# Altium PCB a4403-ELE_PCB.PcbDoc (part 5 of 5)
Units mm, origin at the board's own origin, x right, y up, seen from the top; angles counter-clockwise.
Board outline 160 x 110 mm, 4 copper layers (Top Layer, Int1 (GND), Int2 (PWR), Bottom Layer), stack 1.369 mm thick; 389 components, 298 nets, 1653 pads, 661 vias.
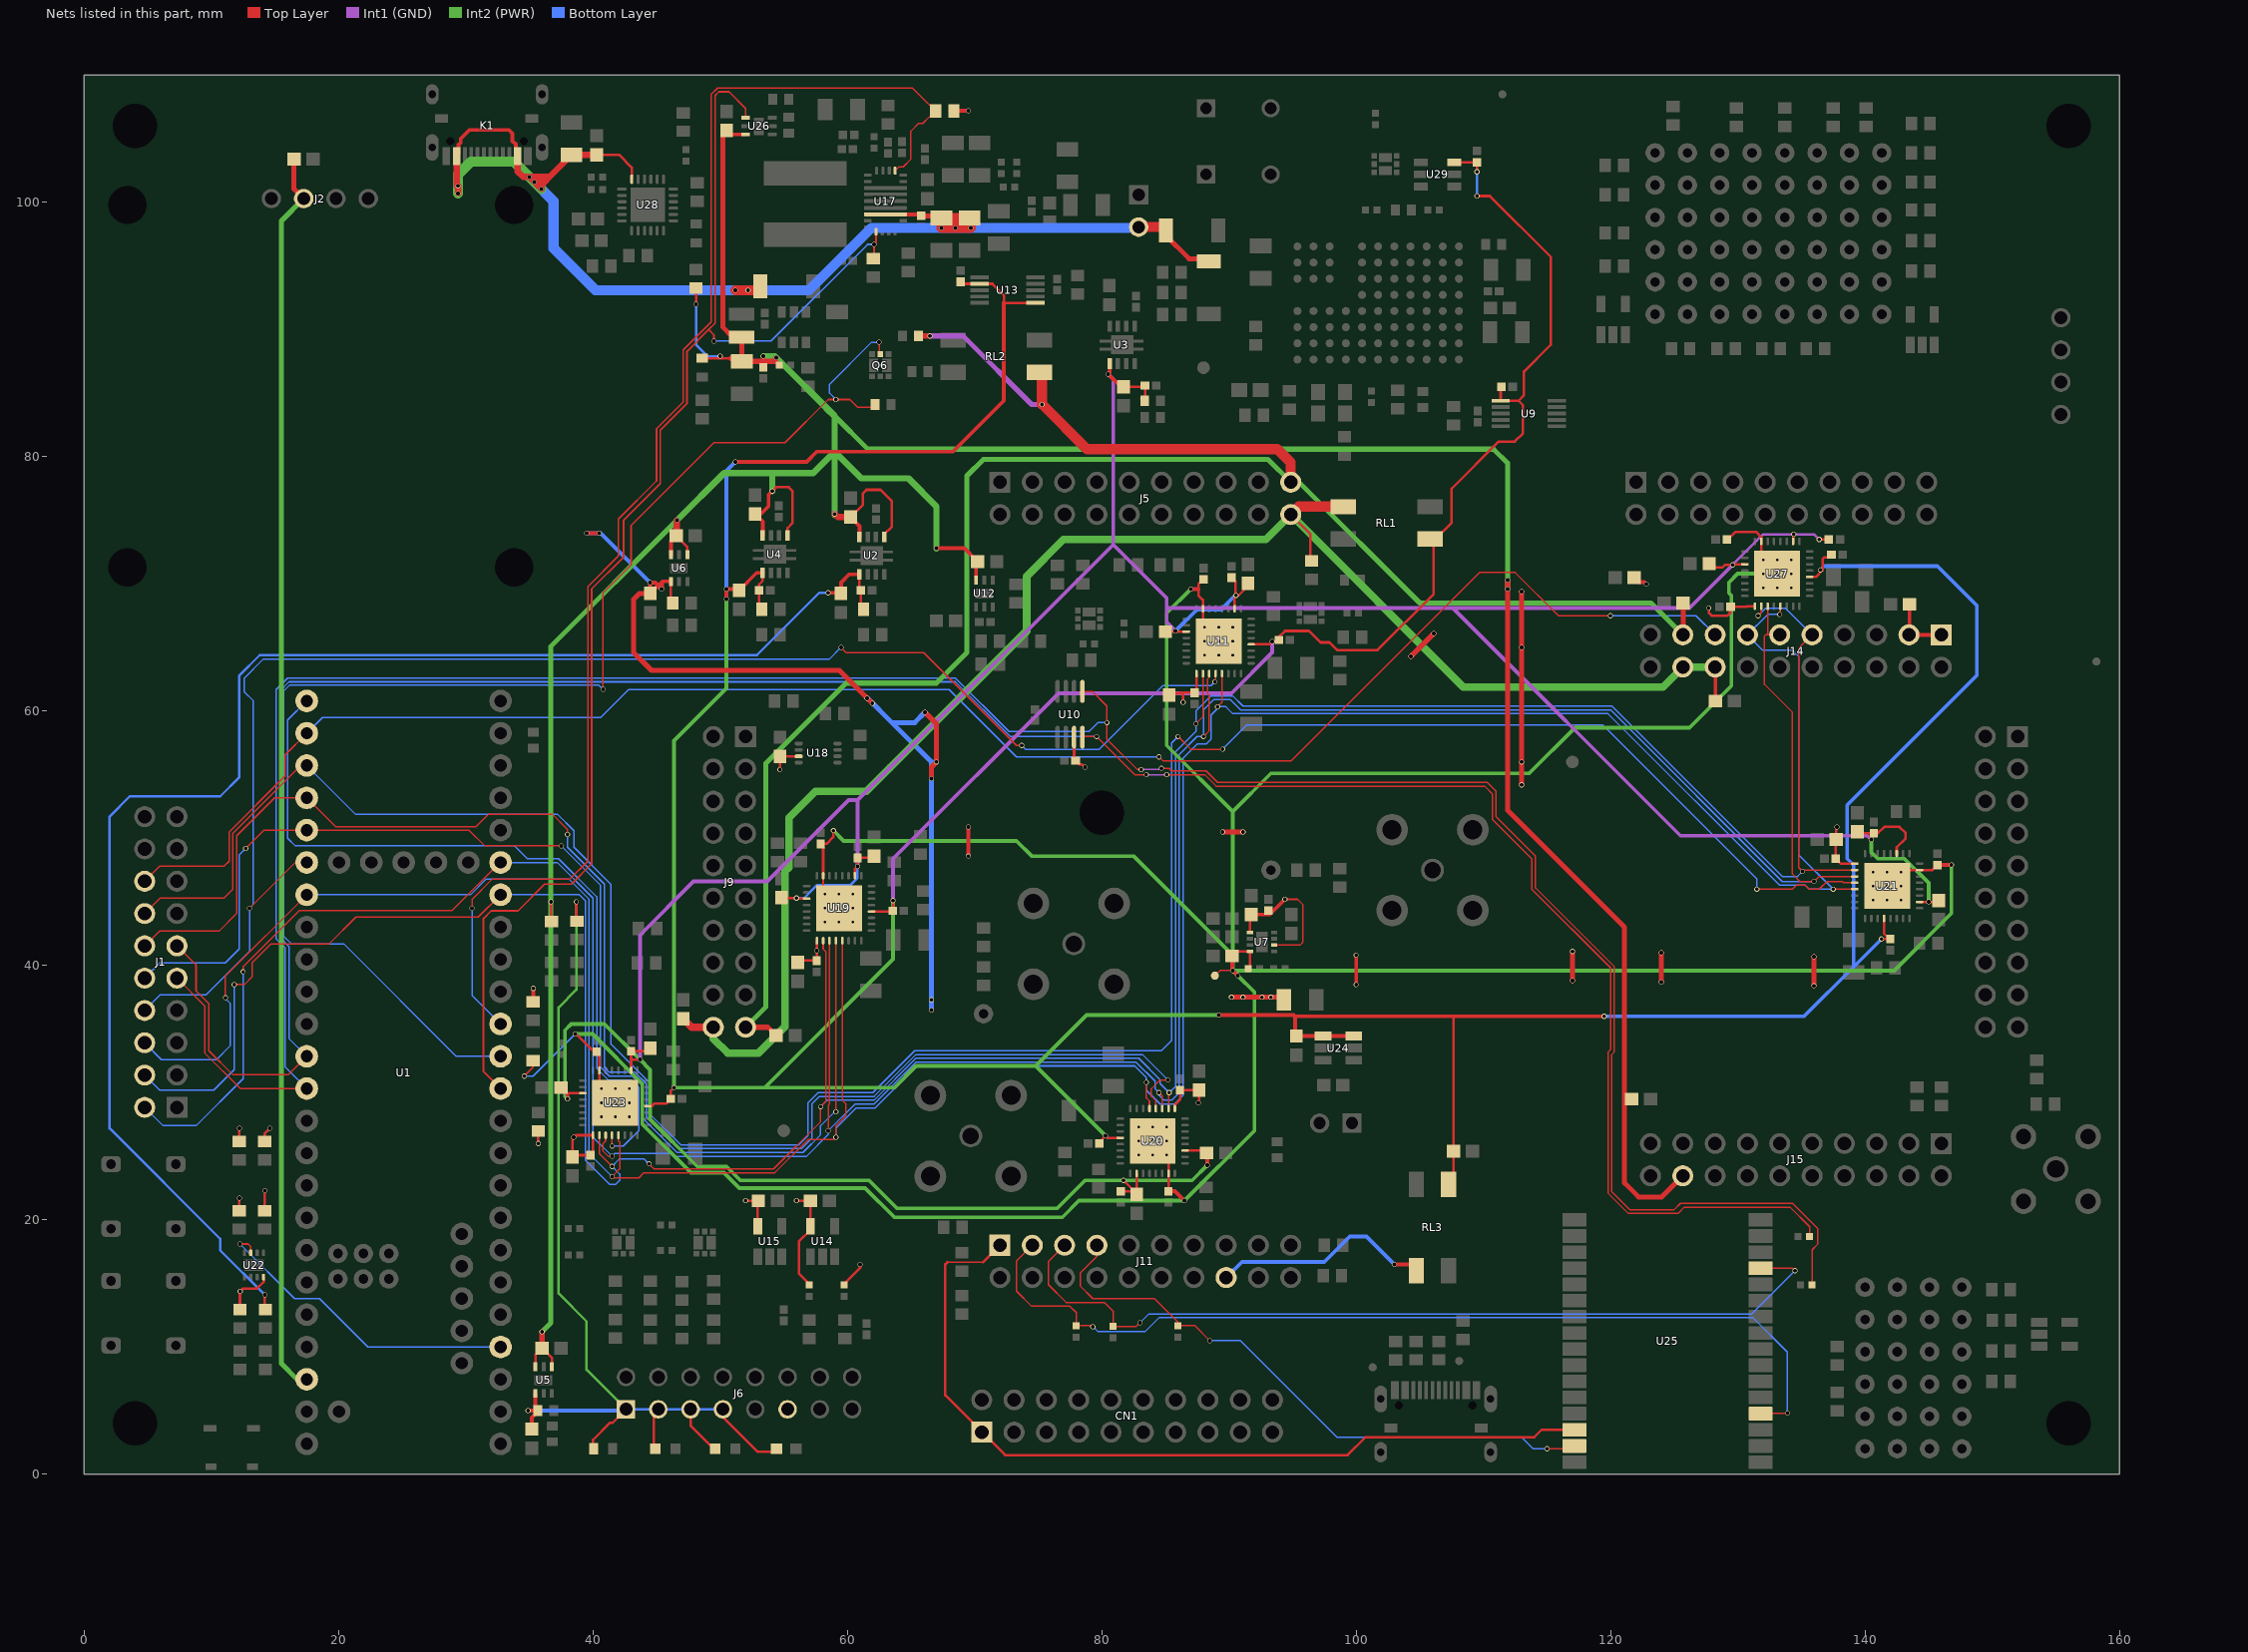
[diagram p6: the nets of this part, all layers, seen from the top]

## Via types
v1: diameter 0.4, hole 0.3, Top Layer to Bottom Layer, tented both sides, 576 vias
v2: diameter 0.5, hole 0.2, Top Layer to Bottom Layer, tented both sides, 59 vias
v3: diameter 0.4, hole 0.2, Top Layer to Bottom Layer, tented both sides, 24 vias
v4: diameter 0.5, hole 0.2, Top Layer to Bottom Layer, 2 vias

## Nets (pads, with @x,y where several pads share a name; then routed paths per layer and width w, separated by ;. In a path a pad name is that pad's centre, name@x,y a point inside that pad or via, vN(x,y) a via of type N, cw(c..) or ccw(c..) an arc to the next point about the centre after c; other vN are vias at no path point) (continued)
RESET: J11.7 R104.1 U25.31 | length 48
  Top Layer w0.12: J11.7@79.62,18 79.62,17.12 78.3,15.8 78.3,14.8 79.3,13.8 84.15,13.8 86.138,11.812 86.138,11.762 86.215,11.685 87.315,11.685 v1(88.5,10.5) ; v1(115,2) 116.94,2 U25.31@117.16,2.22
  Bottom Layer w0.12: v1(88.5,10.5) 90.9,10.5 98.5,2.9 113,2.9 113.9,2 v1(115,2)
SCLK: J11.5 R102.1 U25.13 | length 69
  Top Layer w0.12: J11.5@77.08,18 75.8,16.72 75.8,14.9 77.2,13.5 80.2,13.5 80.9,12.8 80.9,11.6 82.7,11.6 v1(83,11.9) ; U25.13@131.8,16.19 134.31,16.19 v1(134.5,16)
  Bottom Layer w0.12: v1(83,11.9) 83.7,12.6 131.1,12.6 v1(134.5,16)
SDIO: J11.3 R101.1 U25.4 | length 75.1
  Top Layer w0.12: J11.3@74.54,18 73.3,16.76 73.3,14.4 74.5,13.2 77.5,13.2 78,12.7 78,11.7 79.124,11.7 79.224,11.6 v1(79.3,11.6) ; U25.4@131.8,4.76 131.84,4.8 v1(133.9,4.8)
  Bottom Layer w0.12: v1(79.3,11.6) 79.7,11.2 83.4,11.2 84.5,12.3 131.2,12.3 133.9,9.6 v1(133.9,4.8)
SPI_CS2_HDR4: J1.16 J14.15 U1.25 | length 142.5
  Top Layer w0.12: J1.16@4.76,46.62 5.94,47.8 11,47.8 11.4,48.2 11.4,50.5 15.8,54.9 15.8,56.56 U1.25@17.5,58.26 ; v1(84.5,56.4) 84.8,56.1 94.9,56.1 109.7,70.9 112.5,70.9 115.9,67.5 v1(120,67.5)
  Bottom Layer w0.12: U1.25@17.5,58.26 18.74,59.5 40.6,59.5 42.8,61.7 68,61.7 73.3,56.4 v1(84.5,56.4) ; v1(120,67.5) 126.72,67.5 J14.15@128.22,66
SPI_CS_HDR1: J1.8 U1.29 U11.4 | length 121.5
  Top Layer w0.12: v1(13,44.5) 16.6,48.1 U1.29@17.5,48.1 ; v1(59.5,65) 59.9,64.6 66,64.6 73.3,57.3 v1(73.7,57.3) ; v1(88.9,62.3) 88.95,62.35 U11.4@88.95,62.95
  Bottom Layer w0.12: J1.8@4.76,36.46 6,37.7 9.6,37.7 13,41.1 v1(13,44.5) 13.3,44.8 13.3,60.8 12.6,61.5 12.6,62.6 14.1,64.1 58.6,64.1 v1(59.5,65) ; v1(73.7,57.3) 74,57 79.8,57 84.8,62 88.6,62 v1(88.9,62.3)
SPI_CS_HDR2: J1.10 U1.28 U19.4 | length 99
  Top Layer w0.12: v1(12.7,49.2) 14.14,50.64 U1.28@17.5,50.64 30.26,50.64 31.5,49.4 v1(37.5,49.4) ; v1(59.1,28.5) U19.4@59.1,41.95
  Bottom Layer w0.12: J1.10@4.76,39 5.96,40.2 11.1,40.2 12.2,41.3 12.2,48.7 v1(12.7,49.2) ; v1(37.5,49.4) 40.6,46.3 40.6,32 41.3,31.3 43.1,31.3 43.9,30.5 43.9,28 46.6,25.3 56.508,25.3 57.9,26.692 57.9,27.4 59,28.5 v1(59.1,28.5)
SPI_CS_HDR3: J1.12 U1.27 U20.4 | length 120.6
  Top Layer w0.12: J1.12@4.76,41.54 5.92,42.7 10.6,42.7 12,44.1 12,50.2 14.98,53.18 U1.27@17.5,53.18 19.78,50.9 30.8,50.9 31.8,51.9 36.8,51.9 38,50.7 v1(38,50.3) ; U20.4@84.25,28.75 84.25,29.35 83.9,29.7 83.9,30.3 84.6,31 v1(85.2,31)
  Bottom Layer w0.12: v1(38,50.3) 38,49.3 40.9,46.4 40.9,32 41.3,31.6 43.3,31.6 44.2,30.7 44.2,28.1 46.7,25.6 56.4,25.6 57.2,26.4 57.2,29.1 57.8,29.7 62.1,29.7 65.4,33 83.2,33 v1(85.2,31)
SPI_CS_HDR4: J1.14 U1.26 U21.4 | length 199.8
  Top Layer w0.12: J1.14@4.76,44.08 5.98,45.3 11,45.3 11.7,46 11.7,50.4 17.02,55.72 U1.26@17.5,55.72 ; v1(86,58) 87,57 v1(89.5,57) ; v1(131.5,46) 134.3,46 134.6,46.3 135.3,46.3 135.6,46 136.4,46 137,46.6 138.2,46.6 138.3,46.5 U21.4@139.2,46.5
  Bottom Layer w0.12: U1.26@17.5,55.72 21.32,51.9 37.2,51.9 38.5,50.6 38.5,49.3 41.4,46.4 41.4,33.85 44.5,30.75 44.5,28.3 46.9,25.9 56.2,25.9 56.9,26.6 56.9,29.2 57.7,30 62,30 65.3,33.3 84.7,33.3 85.5,34.1 85.5,57.5 v1(86,58) ; v1(89.5,57) 91.4,58.9 119.4,58.9 131.5,46.8 v1(131.5,46)
SPI_CS_IOX: U1.24 U23.4 | length 61.9
  Top Layer w0.12: v1(41.5,25.8) U23.4@41.5,26.65
  Bottom Layer w0.12: U1.24@17.5,60.8 16,59.3 16,50 16.6,49.4 33.85,49.4 34.85,48.4 37.3,48.4 40.3,45.4 40.3,31.9 41.2,31 43,31 43.6,30.4 43.6,27 42.4,25.8 v1(41.5,25.8)
SPI_MISO: J1.6 J14.13 U1.30 U11.5 U19.5 U20.5 U21.5 U23.5 U27.5 | length 260
  Top Layer w0.12: v1(11.108,37.459) 11.1,37.467 11.1,39.16 U1.30@17.5,45.56 ; U23.5@42,26.65 42,26.2 42.1,26.1 42.1,24 v1(41.5,23.4) 41.5,23.3 43.6,23.3 44,23.7 54.3,23.7 56.9,26.3 58.9,26.3 v1(59.1,26.5) 59.1,27.4 59.9,28.2 59.9,29.1 59.6,29.4 U19.5@59.6,41.95 ; v1(83.5,30.8) 83.5,29.6 83.75,29.35 U20.5@83.75,28.75 ; v1(89.1,60.35) 89.45,60.7 U11.5@89.45,62.95 ; v1(133.3,67.6) 133.335,67.635 133.335,68.235 U27.5@133.35,68.25 ; v1(137.5,46) U21.5@139.2,46
  Bottom Layer w0.12: J1.6@4.76,33.92 6.08,32.6 10.4,32.6 11.5,33.7 11.5,37 11.108,37.392 v1(11.108,37.459) ; U1.30@17.5,45.56 30.36,45.56 31.6,46.8 38.1,46.8 39.7,45.2 39.7,25.2 v1(41.5,23.4) ; v1(59.1,26.5) 59.1,27.2 60.7,28.8 62.2,28.8 65.5,32.1 82.6,32.1 83.5,31.2 v1(83.5,30.8) 83.5,30.2 84.6,29.1 85.7,29.1 86.4,29.8 86.4,56.3 87.5,57.4 88.2,57.4 88.6,57.8 88.6,59.7 89.1,60.2 v1(89.1,60.35) 89.75,60.35 90.3,59.8 119.8,59.8 133.3,46.3 135.3,46.3 135.6,46 v1(137.5,46) 134.8,48.7 134.8,64.3 134.3,64.8 131.96,64.8 J14.13@130.76,66 132.36,67.6 v1(133.3,67.6)
SPI_MOSI: J1.4 J14.9 U1.17 U11.2 U19.2 U20.2 U21.2 U23.2 U27.2 | length 257.8
  Top Layer w0.12: v1(11.8,38.5) 12.6,38.5 13.2,39.1 13.2,40.2 14.7,41.7 19.275,41.7 21.375,43.8 30.98,43.8 U1.17@32.74,45.56 ; U23.2@40.5,26.65 40.5,25.2 v1(41.5,24.2) ; v1(44.4,24.4) 44.8,24 54.2,24 57.9,27.7 v1(57.9,28.9) 58.3,29.3 58.3,41.1 58.1,41.3 U19.2@58.1,41.95 ; U20.2@85.25,28.75 85.25,29.95 v1(85.3,30) ; v1(87.4,59) 87.95,59.55 U11.2@87.95,62.95 ; v1(131.6,67.5) 131.6,67.52 131.85,67.77 U27.2@131.85,68.25 ; J14.9@135.84,66 134.8,64.96 134.8,47.7 v1(135.1,47.4) 135.2,47.5 U21.2@139.2,47.5
  Bottom Layer w0.12: J1.4@4.76,31.38 5.94,30.2 10.2,30.2 11.8,31.8 v1(11.8,38.5) ; U1.17@32.74,45.56 38.94,45.56 39.4,45.1 39.4,24.7 41.3,22.8 41.8,22.8 42.1,23.1 42.1,23.6 v1(41.5,24.2) 42.1,24.8 43.8,24.8 44,24.8 v1(44.4,24.4) ; v1(57.9,28.9) 58.4,29.4 62.1,29.4 65.4,32.7 82.9,32.7 84.6,31 84.6,30.7 v1(85.3,30) 85.8,30.5 85.8,56.8 87.4,58.4 v1(87.4,59) 87.4,60 88.6,61.2 90.3,61.2 91.1,60.4 120.1,60.4 133.5,47 134.7,47 v1(135.1,47.4) ; v1(131.6,67.5) 132.2,68.1 133.74,68.1 J14.9@135.84,66
SPI_SCK: J1.2 J14.11 U1.18 U11.3 U19.3 U20.3 U21.3 U23.3 U27.3 | length 259.4
  Top Layer w0.12: v1(12.5,39.5) 12.5,39.9 16.9,44.3 28.9,44.3 32.7,48.1 U1.18@32.74,48.1 ; U23.3@41,26.65 41,26.2 40.8,26 40.8,25.4 41.2,25 v1(41.5,25) ; v1@58.6,27.1 v1(58.5,27) 58.5,29 58.6,29.1 U19.3@58.6,41.95 ; v1(84.5,30) 84.75,29.75 U20.3@84.75,28.75 ; v1(88,58) 88.45,58.45 88.45,61.25 88.3,61.4 88.3,62.5 88.45,62.65 U11.3@88.45,62.95 ; U27.3@132.35,68.25 132.35,66 ; J14.11@133.3,66 132.35,66 ; U21.3@139.2,47 136.4,47 v1(136,46.6) 134.9,46.6 134.3,47.2 134.3,59.9 132.1,62.1 132.1,65.9 132.2,66 132.35,66
  Bottom Layer w0.12: J1.2@4.76,28.84 6.2,27.4 8.8,27.4 12.5,31.1 v1(12.5,39.5) ; U1.18@32.74,48.1 37.2,48.1 40,45.3 40,26.5 v1(41.5,25) 41.7,25.2 46.3,25.2 46.5,25 56.8,25 58.5,26.7 v1(58.5,27) 60.6,29.1 62.1,29.1 65.4,32.4 82.7,32.4 84.2,30.9 84.2,30.3 v1(84.5,30) 84.5,29.8 84.9,29.4 85.5,29.4 86.1,30 86.1,56.6 87.5,58 v1(88,58) 88,60.1 88.8,60.9 90.1,60.9 90.9,60.1 120,60.1 133.5,46.6 v1(136,46.6)
TEENSY3V3: C1.2 J2.2 U1.45 | length 98.3
  Top Layer w0.4: C1.2@16.5,103.4 16.5,101.06 J2.2@17.26,100.3
  Int2 (PWR) w0.4: J2.2@17.26,100.3 15.5,98.54 15.5,8.7 16.74,7.46 U1.45@17.5,7.46
TEMP_ALERT: U1.3 U22.3 | length 25.3
  Top Layer w0.14: v1(12.25,18.1) 12.9,18.1 13.1,17.9 U22.3@13.1,17.4
  Bottom Layer w0.14: v1(12.25,18.1) 16.55,13.8 18.5,13.8 22.3,10 U1.3@32.74,10
UART_RX: J1.9 R135.2 U1.36 U10.5 | length 211.3
  Top Layer w0.12: J1.9@7.3,39 9.47,36.83 9.47,33.13 12.28,30.32 U1.36@17.5,30.32 ; U10.5@78.475,61.55 79.25,61.55 80.4,60.4 v1(80.4,59.1) 80.4,57.8 82.8,55.4 v1(83.1,55.4) ; v1(84.7,55.5) 85.3,55.5 85.5,55.3 88.2,55.3 89.1,54.4 110.3,54.4 111,53.7 111,51.7 114.1,48.6 114.1,46.1 120.3,39.9 120.3,33.2 120.1,33 120.1,22.2 121.5,20.8 125,20.8 125.5,21.3 134.3,21.3 136.3,19.3 136.3,18.1 135.85,17.65 R135.2@135.85,14.9
  Int1 (GND) w0.12: v1(83.1,55.4) 84.6,55.4 v1(84.7,55.5)
  Bottom Layer w0.12: U1.36@17.5,30.32 15.8,32.02 15.8,41.4 15.1,42.1 15.1,61.7 16,62.6 68.5,62.6 72.7,58.4 79,58.4 79.7,59.1 v1(80.4,59.1)
UART_TX: J1.11 R136.2 U1.35 U10.4 | length 201.8
  Top Layer w0.12: J1.11@7.3,41.54 8.8,40.04 8.8,38 9.8,37 9.8,33.3 11.7,31.4 16.04,31.4 U1.35@17.5,32.86 ; U10.4@78.475,57.95 78.525,58 v1(79.6,58) 82.6,55 v1(83.5,55) ; v1(85.1,55) 88.1,55 89,54.1 110.1,54.1 110.7,53.5 110.7,51.5 113.8,48.4 113.8,46 120,39.8 120,33.4 119.8,33.2 119.8,22.1 121.4,20.5 125.3,20.5 125.8,21 134.1,21 135.65,19.45 R136.2@135.65,18.7
  Int1 (GND) w0.12: v1(83.5,55) v1(85.1,55)
  Bottom Layer w0.12: U1.35@17.5,32.86 16.1,34.26 16.1,41.5 15.4,42.2 15.4,61.6 16.1,62.3 68.5,62.3 72.8,58 v1(79.6,58)
V3V3A: C3.2 C6.2 R8.2 R15.2 U2.1 | length 118.8
  Top Layer w0.2: v1(14.2,14.1) 14.2,13 R8.2@14.25,12.95 ; U2.1@60.95,70.75 60.95,69.61 C3.2@61.06,69.5 61.06,68.215 R15.2@61.275,68
  Top Layer w0.3: v1(58.5,69.3) 59.45,69.3 C6.2@59.5,69.25 59.5,70.1 60.15,70.75 U2.1@60.95,70.75
  Bottom Layer w0.2: v1(14.2,14.1) 10.7,17.6 10.7,18.5 2,27.2 2,51.7 3.6,53.3 10.7,53.3 12.2,54.8 12.2,62.8 13.8,64.4 52.9,64.4 57.8,69.3 v1(58.5,69.3)
V3V3D: C15.2 C16.2 C22.2 C34.2 C42.2 C44.1 C51.2 C53.2 C66.2 C75.2 C77.1 C84.2 C86.1 C87.2 C97.2 C99.1 C115.2 C122.2 C124.1 C135.2 C137.1 J6.11 J14.1 J14.3 R1.2 R2.2 R3.1 R4.2 R5.2 R9.2 R23.2 R51.2 R63.2 R80.2 R132.2 U6.1 U7.1 U7.6 U10.3 U11.1 U14.5 U15.5 U18.3 U19.1 U20.1 U21.1 U22.8 U23.1 U27.1 | length 191
  Top Layer w0.12: U7.6@93.55,41.6 95.6,41.6 95.8,41.8 95.8,44.8 95.4,45.2 v1(94.4,45.2) ; C97.2@137.75,49.9 C97.2@138.15,49.5
  Top Layer w0.2: R1.2@12.2,20.725 v1(12.2,21.7) ; R4.2@12.2,26.15 v1(12.2,27.2) ; R9.2@12.25,12.95 12.25,14.35 v1(12.269,14.369) 12.5,14.6 13.6,14.6 14.1,15.1 U22.8@14.1,15.5 ; R2.2@14.2,20.725 v1(14.2,22.3) ; R5.2@14.2,26.15 14.2,26.8 v1(14.6,27.2) ; v1(35.7,26) R3.1@35.7,26.975 ; U6.1@46.125,70.2 46.125,68.65 R23.2@46.275,68.5 ; v1(52,21.5) C51.2@53,21.5 52.95,21.45 U15.5@52.95,19.5 ; v1(54.7,55.4) C66.2@54.7,56.45 U18.3@56.175,56.45 ; v1(56,21.5) C53.2@57.1,21.5 U14.5@57.1,19.5 57.1,19.2 56.18,18.28 56.18,15.795 R63.2@57,14.975 ; C75.2@56.1,40.25 56.23,40.38 C77.1@57.6,40.38 v1(57.6,41.165) U19.1@57.6,41.95 ; R51.2@59.75,14.975 61,16.225 v1(61,16.5) ; U10.3@77.825,57.95 77.825,56.215 C34.2@77.94,56.1 77.96,56.1 78.26,55.8 78.446,55.8 78.646,55.6 v1(78.7,55.6) ; C42.2@85.7,61.4 86.15,61.4 86.19,61.44 86.4,61.44 ; U20.1@85.75,28.75 85.75,29.05 86.15,29.45 C86.1@86.15,30.2 C84.2@87.65,30.2 87.65,29.25 v1(87.6,29.2) ; v1(86.4,60.7) 86.4,61.44 ; U11.1@87.45,62.95 87.45,61.49 87.5,61.44 C44.1@87.3,61.44 86.4,61.44 ; C15.2@91.43,43.75 91.5,43.75 C15.2@91.65,43.9 ; U7.1@91.65,42.6 C15.2@91.65,43.9 ; C15.2@91.75,44 C15.2@91.65,43.9 ; v1(127.7,68.1) 127.738,68.062 127.738,67.71 127.949,67.5 129.2,67.5 129.4,67.7 129.4,68.16 C137.1@129.44,68.2 130.7,68.2 130.75,68.25 U27.1@131.35,68.25 ; v1(137.8,50.9) 137.75,50.85 C97.2@137.75,49.9 137.7,49.85 C99.1@137.7,48.4 138.1,48 U21.1@139.2,48 ; C122.2@38.4,24.95 38.53,25.08 C124.1@39.8,25.08 40,25.28 U23.1@40,26.65 38.65,26.65 v1(38.5,26.5) 38.4,26.4 C122.2@38.4,24.95
  Top Layer w0.3: R132.2@35.3,37.125 v1(35.3,38.2) ; v1(39.5,74) v1(40.5,74) ; U6.1@46.125,70.2 45.45,70.2 ; R80.2@68.1,107.2 R80.2@68.375,107.2 v1(69.5,107.2) ; v1(69.5,48.6) v1(69.5,50.9) ; C15.2@91.75,44 93.2,44 v1(94.4,45.2) ; v1(100,38.5) v1(100,40.8) ; C135.2@121.85,70.5 122.2,70.15 122.65,70.15 v1(122.8,70) ; C87.2@143.5,68.4 143.5,66.04 J14.3@143.46,66 J14.1@146,66 ; 45.125,69.875 44.9,70.1 v1(44.5,70.1) C16.2@44.5,69.25 45.125,69.875 ; 45.125,69.875 v1(45.4,69.6) 45.45,69.65 45.45,70.2 ; 45.125,69.875 45.45,70.2
  Top Layer w0.4: C16.2@44.5,69.25 43.65,69.25 43.2,68.8 43.2,64.6 44.6,63.2 59.373,63.2 v1(61.554,61.019) v1(61.966,60.606) ; v1(66.1,59.9) 67,59 v1(67,56) 66.6,55.6 v1(66.6,54.7) ; v1(89.5,50.5) v1(91.1,50.5) ; v1(90.2,37.5) v1(91.1,37.5) v1(92.6,37.5) v1(93.3,37.5) 94.125,37.5 C115.2@94.325,37.3 ; v1(104.3,64.3) v1(106.1,66.1) ; v1(113,54.2) v1(113,56) v1(113,65) v1(113,69.4) ; v1(117,38.8) v1(117,41.1) ; v1(124,38.7) v1(124,41) ; v1(136,38.4) v1(136,40.7)
  Bottom Layer w0.3: v1(39.5,74) v1(40.5,74) 40.6,74 v1(44.5,70.1) 44.9,70.1 v1(45.4,69.6)
  Bottom Layer w0.4: v1(61.554,61.019) 61.581,61.019 63.5,59.1 ; v1(66.1,59.9) 65.3,59.1 63.5,59.1 ; v1(66.6,36.5) 66.6,56 ; v1(67,56) 66.6,56 ; v1(90.2,37.5) v1(91.1,37.5) v1(92.6,37.5) v1(93.3,37.5) ; 63.5,59.1 66.6,56
  other v1: 66.6,37.3
V5V: C20.2 D2.2 D3.2 D4.1 D5.1 J6.1 J6.3 J6.5 J6.7 R7.2 R22.2 U5.1 | length 81.4
  Top Layer w0.2: R22.2@35.675,4.925 R22.2@35.675,5 ; v1(38.7,45) 38.7,43.525 R7.2@38.75,43.475 ; D2.2@40,1.75 40,2.7 41.33,4.03 41.53,4.03 J6.1@42.6,5.1 ; D3.2@45,1.75 44.8,1.95 44.8,4.76 J6.3@45.14,5.1 ; J6.5@47.7,5.21 47.7,3.8 D4.1@49.75,1.75 ; J6.7@50.22,5.1 50.22,4.48 52.95,1.75 D5.1@54.5,1.75
  Top Layer w0.3: v1(34.9,5) R22.2@35.6,5 ; C20.2@35.2,3.55 35.2,4.45 35.675,4.925 R22.2@35.6,5 ; U5.1@35.475,6.35 35.475,5.125 R22.2@35.6,5 ; R22.2@35.675,5 R22.2@35.6,5
  Int2 (PWR) w0.2: v1(38.7,45) 38.7,38.1 37.3,36.7 37.3,14.2 39.5,12 39.5,8.2 J6.1@42.165,5.535
  Bottom Layer w0.2: J6.1@42.6,5.1 J6.3@45.14,5.1 J6.5@47.68,5.1 J6.7@50.22,5.1
  Bottom Layer w0.3: v1(34.9,5) 42.5,5 J6.1@42.6,5.1
V5VA: C5.2 C8.2 C33.2 C37.1 C49.2 C65.2 C70.1 C80.1 C92.1 C113.2 C117.1 C126.2 C130.1 R17.2 RL1.1 RL3.1 U4.1 U9.6 U11.12 U13.2 U13.6 U19.12 U20.12 U21.12 U23.12 U24.3 U24.4 U27.12 U29.6 | length 405.4
  Top Layer w0.2: U23.12@44.3,28.95 44.65,28.95 44.856,29.156 45.776,29.156 C117.1@46.12,29.5 46.12,30.16 v1(46.36,30.4) ; R17.2@53.275,68 53.06,68.215 C5.2@53.06,69.5 53.06,69.96 53.344,70.244 U4.1@53.344,70.865 ; U19.12@61.9,44.25 C70.1@63.517,44.241 ; C70.1@63.56,44.3 63.6,44.34 v1(63.6,45.1) ; C49.2@68.9,93.76 69.06,93.6 71.4,93.6 72.3,92.7 72.3,92.1 U13.6@74.8,92.1 ; C80.1@79.9,26.2 v1(80.3,26.6) 80.45,26.45 U20.12@81.45,26.45 ; U11.12@91.75,65.25 93.185,65.25 v1(93.407,65.471) 93.791,65.471 C37.1@93.92,65.6 93.92,65.82 94.4,66.3 96.3,66.3 97.2,65.4 97.9,65.4 98.5,64.8 101.69,64.8 106.1,69.21 106.1,73.4 107.5,74.8 107.5,77.5 111.2,81.2 112.46,81.2 113.11,81.85 113.11,84.05 112.76,84.4 ; RL3.1@107.54,23.5 107.65,23.61 C113.2@107.65,25.4 107.65,35.95 107.7,36 ; U29.6@107.7,103.15 107.71,103.16 C65.2@109.5,103.16 v1(109.5,102.4) ; v1(109.5,100.5) 110.5,100.5 115.3,95.7 115.3,88.8 113.2,86.7 113.2,84.84 112.76,84.4 ; C33.2@111.42,85.5 111.36,85.44 U9.6@111.36,84.4 112.76,84.4 ; U27.12@135.65,70.55 136.15,70.55 136.667,71.067 136.667,71.963 136.784,72.08 137.14,72.08 C130.1@137.36,72.3 ; v1(141.3,42.08) C92.1@142,42.08 ; U21.12@141.5,43.7 141.5,42.5 C92.1@141.75,42.25
  Top Layer w0.3: v1(50.5,68.8) v1(50.5,69.6) 51.4,69.6 C8.2@51.5,69.5 52.865,70.865 U4.1@53.344,70.865 ; v1(51.2,79.6) 56.8,79.6 57.6,80.4 68.3,80.4 72.3,84.4 72.3,92.1 ; v1(89.2,36.1) 95.1,36.1 95.2,36 ; U24.3@99.8,34.45 U24.4@97.4,34.45 C126.2@95.3,34.45 95.2,34.55 95.2,36 ; v1(119.5,36) 107.7,36 95.2,36
  Int1 (GND) w0.3: v1(63.6,45.1) 63.6,48.4 76.6,61.4 90.2,61.4 93.407,64.607 v1(93.407,65.471)
  Int2 (PWR) w0.3: v1(50.5,69.6) 50.5,61.8 46.36,57.66 v1(46.36,30.4) 53.5,30.4 ; v1(63.6,45.1) 63.6,40.5 53.5,30.4 ; v1(80.3,26.6) 74.8,32.1 ; v1(89.2,36.1) 78.8,36.1 74.8,32.1 ; 53.5,30.4 63.7,30.4 65.4,32.1 74.8,32.1
  Bottom Layer w0.2: v1(109.5,100.5) v1(109.5,102.4)
  Bottom Layer w0.3: v1(50.5,68.8) 50.5,78.9 v1(51.2,79.6) ; v1(119.5,36) 135.22,36 139.11,39.89 ; v1(136.5,71.1) 136.8,71.4 145.7,71.4 148.8,68.3 148.8,62.8 138.6,52.6 138.6,48.4 139.11,47.89 139.11,39.89 ; v1(141.3,42.08) 139.11,39.89
V12VA: C4.2 C7.2 C40.2 C41.1 C43.2 C73.2 C74.1 C76.2 C82.2 C83.1 C85.2 C95.2 C96.1 C98.2 C120.2 C121.1 C123.2 C133.2 C134.1 R16.2 U3.1 U11.18 U11.27 U19.18 U19.27 U20.18 U20.27 U21.18 U21.27 U23.18 U23.27 U27.18 U27.27 | length 310.9
  Top Layer w0.2: C123.2@37.5,30.4 37.95,29.95 U23.27@39.2,29.95 ; U23.18@43,31.75 43,32.5 ; v1(43.7,32.6) 43.1,32.6 43,32.5 ; C120.2@44.5,33.5 44.25,33.25 C121.1@43,33.25 43,32.5 ; C73.2@54.825,45.325 C73.2@54.85,45.3 ; C73.2@55.075,45.075 C73.2@54.85,45.3 ; U19.27@56.8,45.25 56.05,45.25 v1(56,45.3) C73.2@54.85,45.3 ; U19.18@60.6,47.05 60.6,47.6 v1(60.8,47.8) 60.8,48.26 60.6,48.46 C74.1@60.8,48.46 61.76,48.46 C76.2@61.9,48.6 ; C83.1@81.5,22.25 82.5,22.25 C85.2@82.75,22 C85.2@82.75,22.05 ; v1(81.7,23.1) C85.2@82.75,22.05 ; C7.2@81.95,85.75 C7.2@81.7,85.5 83.3,85.5 C4.2@83.4,85.6 83.4,84.425 R16.2@83.375,84.4 ; U20.18@82.75,23.65 C85.2@82.75,22.05 ; R16.2@83.12,84.555 R16.2@83.275,84.4 ; C40.2@85,66.25 v1@85.825,66.25 ; v1(85.8,66.3) 85.875,66.3 v1@85.825,66.25 ; U20.27@86.55,25.45 88.05,25.45 C82.2@88.25,25.25 C82.2@88.5,25.5 ; U11.27@86.65,66.25 v1@85.825,66.25 ; C41.1@90.2,70.5 90.5,70.2 v1@90.5,69.05 ; U11.18@90.45,68.05 90.45,69 v1(90.55,69.1) 90.75,69.1 C43.2@91.3,69.65 ; C133.2@127.75,71.6 128.05,71.3 128.8,71.3 129,71.5 v1(129.6,71.5) ; v1@129.654,71.5 129.704,71.55 U27.27@130.55,71.55 ; U27.18@134.35,73.35 134.35,73.85 v1(134.4,73.9) ; v1(136.4,73.5) C134.1@137.16,73.5 ; C95.2@139.4,50.5 139.5,50.4 C96.1@140.7,50.4 ; C96.1@140.5,50.2 C96.1@140.7,50.4 ; U21.27@142.5,48.8 142.5,49.3 143.2,50 143.2,50.4 142.7,50.9 141.525,50.9 141.025,50.4 C96.1@140.7,50.4 ; U21.18@144.3,45 145.7,45 C98.2@145.8,45.1
  Top Layer w0.3: C123.2@37.95,29.95 38,29.9 v1(38,29.5) ; U3.1@80.625,87.325 80.625,86.625 v1(80.5,86.5) 81.5,85.5 C7.2@81.7,85.5 ; C82.2@88.25,25.25 88.3,25.2 v1(88.3,24.3) ; v1(140.5,49.9) C96.1@140.5,50.2
  Int1 (GND) w0.2: v1(129.6,71.5) 132,73.9 v1(134.4,73.9) 136,73.9 v1(136.4,73.5)
  Int1 (GND) w0.3: v1(43.7,32.6) 43.7,42.4 47.9,46.6 53.7,46.6 60.1,53 60.8,53 ; v1(60.8,47.8) 60.8,53 ; v1(80.5,86.5) 80.9,86.1 80.9,73.1 ; v1(85.8,66.3) 85.1,67 85.1,68.1 ; v1(129.6,71.5) 126.2,68.1 107.6,68.1 ; v1(140.5,49.9) 140.2,50.2 125.5,50.2 107.6,68.1 ; 60.8,53 80.9,73.1 ; 80.9,73.1 85.1,68.9 85.1,68.1 ; 85.1,68.1 107.6,68.1
  Int2 (PWR) w0.3: v1(38,29.5) 37.8,29.7 37.8,34.9 38.3,35.4 40.9,35.4 v1(43.7,32.6) 44.5,31.8 44.5,27.9 48.2,24.2 50.5,24.2 51.6,23.1 61.7,23.1 63.9,20.9 76.5,20.9 78.7,23.1 v1(81.7,23.1) 87.1,23.1 v1(88.3,24.3) ; v1(140.5,49.9) 140.5,48.9 141,48.4 143.1,48.4 145,46.5 v1(145,45)
  Bottom Layer w0.2: v1(56,45.3) 56.6,45.3 57.6,46.3 60.2,46.3 60.8,46.9 v1(60.8,47.8)
  Bottom Layer w0.3: v1(85.8,66.3) 87.5,68 89.4,68 90.5,69.1 v1(90.55,69.1)
VBAT: C68.2 C89.2 J5.20 J9.20 J14.16 J14.18 R30.2 RL1.3 | length 130.1
  Top Layer w0.2: J5.20@94.86,75.46 96.4,73.92 R30.2@96.4,71.75
  Top Layer w0.3: C89.2@128.15,60.7 C89.2@128.25,60.8 128.25,63.43 J14.16@128.22,63.46
  Top Layer w0.6: C68.2@47.1,35.8 47.76,35.14 J9.20@49.46,35.14 ; J14.18@125.68,63.42 J14.18@125.68,63.46
  Top Layer w0.8: J5.20@94.86,75.46 95.48,76.08 RL1.3@99,76.08
  Int2 (PWR) w0.6: J9.20@49.46,35.14 49.46,34.253 50.613,33.1 53,33.1 55.1,35.2 55.1,47.4 55.4,47.7 55.4,51.6 57.5,53.7 61.5,53.7 63.35,55.55 74.1,66.3 74.1,70.6 77,73.5 92.9,73.5 J5.20@94.86,75.46 108.42,61.9 124.12,61.9 J14.18@125.68,63.46 J14.16@128.22,63.46
VBUS: J11.16 RL3.3 | length 17.4
  Top Layer w0.3: v1(103,16.5) 104.23,16.5 RL3.3@104.73,16
  Bottom Layer w0.3: J11.16@89.78,15.46 91.02,16.7 97.5,16.7 99.5,18.7 100.8,18.7 v1(103,16.5)
VCC: CN1.1 J11.1 U25.30 | length 67.5
  Top Layer w0.12: 67.864,16.664 70.664,16.664
  Top Layer w0.2: 67.864,16.664 67.7,16.5 67.7,6.2 72.4,1.5 99.32,1.5 100.72,2.9 114,2.9 114.59,3.49 U25.30@117.16,3.49 ; 70.664,16.664 J11.1@72,18
VDUT: C67.2 C88.2 J5.19 J9.19 J14.17 R84.1 RL2.3 | length 160
  Top Layer w0.4: J9.19@52,35.14 53.76,35.14 C67.2@54.4,34.5 ; R84.1@65.6,89.5 v1(66.5,89.5) ; J14.17@125.68,66 125.7,66.02 C88.2@125.7,68.5
  Top Layer w0.6: RL2.3@75.1,86.63 RL2.3@75.3,86.43 ; v1(75.3,84.1) v1@75.32,84.12
  Top Layer w0.8: v1(75.3,84.1) RL2.3@75.3,86.43 ; v1@75.32,84.12 78.84,80.6 93.8,80.6 94.86,79.54 J5.19@94.86,78
  Int1 (GND) w0.4: v1(66.5,89.5) 69.1,89.5 74.5,84.1 v1(75.3,84.1)
  Int2 (PWR) w0.4: J9.19@52,35.14 53.6,36.74 53.6,55.9 59.9,62.2 67,62.2 69.4,64.6 69.4,78.5 70.7,79.8 93.06,79.8 J5.19@94.86,78 95.5,78 105,68.5 123.18,68.5 J14.17@125.68,66
VDUT_EN: Q6.5 R143.2 U1.12 | length 110.7
  Top Layer w0.12: v1(40.8,61.7) 40.8,69.3 43,71.5 43,74.6 49.5,81.1 55.1,81.1 58.5,84.5 v1(59.1,84.5) 60.2,84.5 60.8,83.9 61.975,83.9 R143.2@62.175,84.1 ; v1(62.5,89) 62.5,88.16 Q6.5@62.585,88.075
  Bottom Layer w0.12: U1.12@32.74,32.86 29.24,32.86 20.4,41.7 16.28,41.7 15.7,42.28 15.7,61.6 16.137,62.037 40.463,62.037 v1(40.8,61.7) ; v1(59.1,84.5) 58.6,85 58.6,85.7 61.9,89 v1(62.5,89)
VDUTSMPS_EN: R73.2 U1.11 U17.1 U26.4 | length 111.7
  Top Layer w0.14: U1.11@32.74,30.32 31.4,31.66 31.4,43.7 32,44.3 34.1,44.3 36.2,46.4 38.3,46.4 39.9,48 39.9,69.6 42.4,72.1 42.4,75 45.3,77.9 45.3,82.1 47.4,84.2 47.4,88.3 49.1,90 ; v1(49.5,89.1) 49.5,89.6 49.1,90 ; U26.4@52,106.65 52,107.4 50.7,108.7 49.9,108.7 49.6,108.4 49.6,90.5 49.1,90 ; R73.2@62,95.35 62.05,95.3 R73.2@62.1,95.35 ; R73.2@62.05,95.35 R73.2@62.1,95.4 ; R73.2@62.05,95.575 62.1,95.625 v1(62.1,96.7) 62.25,96.85 U17.1@62.25,97.7
  Bottom Layer w0.14: v1(49.5,89.1) 54,89.1 61.6,96.7 v1(62.1,96.7)
VDUTSMPS_INT: R80.1 U1.13 U17.14 | length 110.5
  Top Layer w0.12: v1(30.5,44.5) 30.5,45.2 32.1,46.8 38.2,46.8 39.6,48.2 39.6,69.8 42,72.2 42,75.1 45,78.1 45,82.2 47.1,84.3 47.1,88.4 49.3,90.6 49.3,108.5 49.8,109 65.125,109 66.46,107.665 66.535,107.665 66.925,107.275 66.925,107.125 66.535,106.735 66.46,106.735 65.925,106.2 65.6,106.2 65,105.6 65,103.4 64.4,102.8 64.05,102.8 U17.14@63.75,102.5
  Bottom Layer w0.12: v1(30.5,44.5) 30.5,37.64 U1.13@32.74,35.4
VIN: C61.2 C105.2 C106.2 C107.2 C127.2 D1.2 D8.2 D9.2 J3.2 K1.A4B9 K1.A9B4 U17.7 U28.18 | length 121.5
  Top Layer w0.2: C127.2@40.3,103.75 42.05,103.75 43.05,102.75 U28.18@43.05,101.825 ; J3.2@82.53,98.43 82.86,98.1 J3.2@82.9,98.06 J3.2@82.8,98.06
  Top Layer w0.3: K1.A9B4@29.28,103.63 29.43,103.78 29.43,104.53 29.6,104.7 29.6,105 30.299,105.699 33.401,105.699 33.676,105.424 33.676,104.824 33.93,104.57 33.93,103.78 K1.A4B9@34.08,103.63 ; U17.7@63,99.06 65.68,99.06 C107.2@65.8,98.94
  Top Layer w0.4: C107.2@65.8,98.94 67.235,98.94 C105.2@67.4,98.775 ; J3.2@82.75,97.91 J3.2@82.9,98.06 ; D8.2@85.025,97.8 85.025,97.41 86.86,95.575 88.2,95.575 D9.2@88.4,95.375
  Top Layer w0.5: K1.A9B4@29.28,103.63 29.28,101.32 29.3,101.3 v1(29.4,101.3) v1(29.4,100.7) ; K1.A4B9@34.08,103.63 34.08,102.42 34.5,102 v1(35,102) ; C127.2@40.3,103.75 40.275,103.725 C61.2@38.3,103.725 36.575,102 ; J3.2@82.7,97.76 J3.2@82.7,98.09 ; v1(35,102) 36.575,102 ; v1(35,102) v1(35.4,101.6) ; v1(35.4,101.6) 36.175,101.6 ; v1(35.4,101.6) v1(35.95,101.05) 35.95,101.375 36.175,101.6 ; 36.175,101.6 36.575,102
  Top Layer w0.6: J3.2@82.86,98.1 J3.2@82.949,98.1 ; D8.2@84.775,98.06 85.025,97.81 D8.2@85.025,97.8
  Top Layer w0.8: v1(51.2,93.1) v1(52.2,93.1) 53,93.1 53.15,93.25 D1.2@53.15,93.4 ; J3.2@82.9,98.06 D8.2@84.775,98.06 ; v1(68.5,98) 68.5,98.775 ; v1(68.5,98) v1(69.7,98) 69.6,98.1 C106.2@69.6,98.775 68.5,98.775 ; v1(68.5,98) v1(67.4,98) C105.2@67.4,98.775 68.5,98.775
  Int2 (PWR) w0.8: v1(29.4,100.7) v1(29.4,101.3) 29.4,102.2 30.4,103.2 33.8,103.2 v1(35,102) v1(35.95,101.05)
  Bottom Layer w0.5: v1(29.4,100.7) v1(29.4,101.3) 29.4,102.2 30.4,103.2 33.8,103.2 v1(35,102)
  Bottom Layer w0.8: v1(35,102) v1(35.4,101.6) 36.9,100.1 36.9,96.4 40.2,93.1 v1(51.2,93.1) v1(52.2,93.1) 57,93.1 61.9,98 v1(67.4,98) v1(68.5,98) v1(69.7,98) J3.2@82.9,98
VNEG2V5A: C18.2 C39.1 C72.1 C81.1 C94.1 C119.1 C132.1 R21.2 R89.1 TP1.1 U7.4 U11.23 U11.33 U19.23 U19.33 U20.23 U20.33 U21.23 U21.33 U23.23 U23.33 U27.23 U27.33 | length 360.9
  Top Layer w0.12: U19.23@58.1,47.05 58.1,45.75 v2(58.25,45.6) v2(59.35,44.5) ; TP1.1@88.9,39.2 89.3,39.6 v1(90.3,39.6)
  Top Layer w0.14: v1(34.6,31.3) 35.3,32 R89.1@35.3,32.5
  Top Layer w0.2: v1(38.6,34.6) 38.7,34.6 40.5,32.8 U23.23@40.5,31.75 40.5,30.45 v2(40.65,30.3) v2(41.75,29.2) ; U19.23@58.1,47.05 58.1,49.36 C72.1@57.9,49.56 58.36,49.56 58.9,50.1 v1(58.9,50.6) ; v2(84,26.2) v2(85.1,25.1) 85.25,24.95 U20.23@85.25,23.65 C81.1@85.25,22.25 ; C39.1@87.98,70.38 87.6,70 87.6,69.55 87.6,69.1 87.95,68.75 U11.23@87.95,68.05 87.95,66.75 v2(88.1,66.6) v2(89.2,65.5) ; C18.2@90.25,40.75 90.6,41.1 U7.4@91.65,41.1 91.65,39.9 R21.2@91.5,39.75 ; C132.1@129.14,73.4 129.16,73.4 129.38,73.62 129.38,73.64 129.84,74.1 131.425,74.1 131.85,73.675 U27.23@131.85,73.35 131.85,72.05 v2(132,71.9) v2(133.1,70.8) ; v2(141.75,46.25) v2(142.85,47.35) 143,47.5 U21.23@144.3,47.5 145.3,47.5 C94.1@145.7,47.9
  Top Layer w0.3: C81.1@85.25,22.25 85.75,22.25 v1(86.5,21.5) ; v1(87,69.6) 87.55,69.6 87.6,69.55 ; C18.2@90.25,40.75 90.25,40 ; v1(90.7,39.2) v1(90.3,39.6) v1@90.281,39.619 ; C94.1@145.7,47.9 v1(146.8,47.9) ; 90.25,40 90.25,39.65 v1@90.281,39.619 ; 90.25,40 90.281,39.969 v1@90.281,39.619
  Int2 (PWR) w0.12: v2(58.25,43.4) v2(58.25,44.5) v2(58.25,45.6) v2(59.35,45.6) v2(60.45,45.6)
  Int2 (PWR) w0.2: v2(40.65,28.1) v2(40.65,29.2) v2(40.65,30.3) ; v2(41.75,28.1) v2(41.75,29.2) v2(41.75,30.3) ; v2(42.85,28.1) v2(42.85,29.2) v2(42.85,30.3) ; v2(58.25,43.4) v2(59.35,43.4) ; v2(59.35,45.6) v2(59.35,44.5) v2(59.35,43.4) ; v2(60.45,45.6) v2(60.45,44.5) v2(60.45,43.4) v2(59.35,43.4) ; v2(88.1,66.6) v2(89.2,66.6) ; v2(89.2,64.4) v2(89.2,65.5) v2(89.2,66.6) ; v2(90.3,64.4) v2(90.3,65.5) v2(90.3,66.6) v2(89.2,66.6)
  Int2 (PWR) w0.3: v1(38.6,34.6) 39.969,34.6 43.883,30.686 43.883,27.517 47.7,23.7 50.3,23.7 51.5,22.5 61.4,22.5 63.7,20.2 76.9,20.2 78.2,21.5 v1(86.5,21.5) 92,27 92,37.9 v1(90.7,39.2) v1(90.3,39.6) ; v1(58.9,50.6) 59.7,49.8 73.3,49.8 74.5,48.6 82.5,48.6 90.3,40.8 ; v1(87,69.6) 85.1,67.7 85.1,57.3 90.3,52.1 ; v2(88.1,66.6) v2(88.1,65.5) v2(88.1,64.4) v2(89.2,64.4) v2(90.3,64.4) ; v2(140.65,45.15) v2(141.75,45.15) v2(142.85,45.15) ; v2(140.65,46.25) v2(141.75,46.25) v2(142.85,46.25) ; v2(140.65,47.35) v2(141.75,47.35) v2(142.85,47.35) ; v1(146.8,47.9) 146.8,44.1 142.3,39.6 v1(90.3,39.6) ; v1(90.3,39.6) 90.3,40.8 ; 90.3,40.8 90.3,52.1 ; 90.3,52.1 93.3,55.1 113.6,55.1 117.2,58.7 126.2,58.7 129.5,62 129.5,69.096 129.301,69.295 129.301,70.101 130,70.8 v2(132,70.8) ; v2(132,70.8) v2(132,71.9) v2(133.1,71.9) ; v2(132,70.8) v2(132,69.7) v2(133.1,69.7) ; v2(133.1,69.7) v2(133.1,70.8) v2(133.1,71.9) ; v2(133.1,69.7) v2(134.2,69.7) v2(134.2,70.8) v2(134.2,71.9) v2(133.1,71.9)
  Bottom Layer w0.14: v1(34.6,31.3) 35.3,31.3 v1(38.6,34.6)
  other v2: 82.9,25.1 84,25.1 82.9,26.2 85.1,26.2 82.9,27.3 84,27.3 85.1,27.3
VSYS: C9.2 C11.2 C19.2 C21.2 C47.2 C56.1 C90.2 C101.2 C114.2 D7.2 J15.18 L3.1 R6.2 R67.2 R125.2 U2.5 U2.8 U4.5 U4.8 U5.4 U5.6 U6.4 U6.6 U12.6 U26.6 | length 309.8
  Top Layer w0.2: U5.6@35.475,8.45 35.475,9.4 35.975,9.9 C19.2@36,9.9 36.025,9.9 36.775,9.15 U5.4@36.775,8.45 ; v1(36.7,45) 36.7,43.5 R6.2@36.75,43.45 ; C21.2@46.55,73.8 46.55,73.75 47.425,72.875 U6.4@47.425,72.3 ; v1(48.1,92) R125.2@48.1,93.275 ; D7.2@48.6,87.75 v1@50,87.75 ; v1(50,87.9) v1@50,87.75 ; C101.2@51.7,87.5 51.45,87.75 50.85,87.75 v1@50,87.75 ; v1(54.1,77.3) 54.4,77.6 55.4,77.6 55.7,77.3 55.7,74.8 55.294,74.394 U4.5@55.294,73.815 ; C9.2@60.25,75.25 61.2,76.2 61.2,77.1 61.5,77.4 62.6,77.4 63.5,76.5 63.5,74.5 62.9,73.9 U2.5@62.9,73.7
  Top Layer w0.3: C19.2@35.931,9.55 C19.2@36,9.9 C19.2@35.975,9.875 ; U6.6@46.125,72.3 46.125,73.375 C21.2@46.55,73.8 ; C114.2@50.5,105.65 50.8,105.35 U26.6@52,105.35 ; U4.8@53.344,73.815 53.344,74.906 C11.2@52.75,75.5 53.2,75.5 53.8,76.1 53.8,77 v1(54.1,77.3) ; C56.1@53.4,87.04 53.4,87.5 v1(53.4,87.9) ; C9.2@60.25,75.25 60.95,74.55 U2.8@60.95,73.7 ; v1(67,72.8) 69.2,72.8 70.125,71.875 C47.2@70.125,71.625 ; U12.6@70.125,70.3 C47.2@70.125,71.625 ; C47.2@70.25,71.75 C47.2@70.125,71.625 ; 121.1,29.5 C90.2@121.65,29.5 C90.2@121.58,29.57
  Top Layer w0.4: C19.2@36,9.9 v1(36,11.2) ; C114.2@50.5,105.65 50.2,105.35 50.2,90.2 51,89.4 L3.1@51.7,89.4 C101.2@51.7,87.5 ; 50.85,87.75 51.1,87.5 C101.2@51.7,87.5 ; v1(54.4,87.8) 54.35,87.75 54.35,87.5 ; R67.2@54.65,87.2 54.35,87.5 ; v1(111.9,70.3) v1(111.9,69.6) 111.9,52.2 121.1,43 121.1,29.5 121.1,22.9 122.2,21.8 124.02,21.8 J15.18@125.68,23.46 ; C101.2@51.7,87.5 53.4,87.5 54.35,87.5
  Top Layer w0.5: C21.2@46.55,73.75 46.6,73.8 v1(46.6,75) ; v1(59,75.5) 59.25,75.25 C9.2@60.25,75.25
  Int2 (PWR) w0.3: v1@54.3,87.9 v1(54.4,87.8)
  Int2 (PWR) w0.4: v1(36,11.2) 36.7,11.9 v1(36.7,45) 36.7,65.1 v1(46.6,75) ; 58.3,83.8 59,83.1 ; 59,83.2 61.6,80.6 110.8,80.6 111.9,79.5 v1(111.9,70.3) v1(111.9,69.6)
  Int2 (PWR) w0.5: v1(46.6,75) 50.3,78.7 54.1,78.7 ; v1(53.4,87.9) v1@54.3,87.9 ; v1(54.1,77.3) 54.1,78.7 ; v1(54.4,87.8) 59,83.2 ; v1@59,75.4 v1(59,75.5) 59,80.4 ; 59,83.1 59,80.4 ; v1(67,72.8) 67,76.1 64.8,78.3 61.1,78.3 59,80.4 ; 54.1,78.7 57.3,78.7 59,80.4
  Bottom Layer w0.2: v1(48.1,92) 48.1,88.8 49,87.9 v1(50,87.9)
pads on no net: CN1.2 CN1.3 CN1.5 CN1.11 CN1.13 CN1.17 CN1.19 J1.13 J1.15 J1.17 J1.19 J4.5 J4.9 J4.15 J4.19 J4.20 J6.9 J7.2 J7.3 J9.7 J14.12 J15.10 J15.14 J15.16 K1.3 K1.A8 K1.B8 K2.3 R145.2 R147.1 R147.2 R148.1 R149.1 R149.2 R150.1 R150.2 R151.2 R152.1 R152.2 R153.2 R154.1 R154.2 R155.1 R155.2 R156.1 R156.2 R157.1 R157.2 R158.2 R159.2 R160.1 R160.2 R161.2 R162.2 R163.2 R165.2 R166.1 R166.2 R167.2 R168.2 R169.1 R169.2 R170.2 U1.1 U1.2 U1.4 U1.5 U1.6 U1.14 U1.31 U1.34 U1.47 U1.48 U1.53 U1.54 U1.56 U1.57 U1.58 U1.59 U1.60 U1.61 U1.62 U1.63 U2.7 U3.7 U4.7 U5.5 U6.5 U9.3 U12.5 U13.3 U14.1 U15.1 U20.30 U25.1 U25.2 U25.3 U25.5 U25.6 U25.7 U25.9 U25.10 U25.11 U25.14 U25.16 U25.17 U25.18 U25.19 U25.20 U25.21 U25.22 U25.23 U25.25 U25.28 U25.32 U26.5 U27.10 U27.11 U27.15 U27.16 U28.3 U28.4 U28.7 U28.9 U28.11 U28.20 U28.21 U30.1 U30.2 U30.3 U30.4 U30.5 U31.1 U31.2 U31.3 U31.4 U31.5 U32.1 U32.2 U32.3 U32.4 U32.5

## Polygon pours and split planes (outlines as drawn)
GND on Top Layer "Top Layer-GND" (solid, remove dead copper, pour order 5): 0.5,109.5 0.5,0.5 159.5,0.5 159.5,109.5
GNDU on Top Layer "GNDU_L01_P000" (solid, pour order 0): 26.5,109.5 48,109.5 48,104 46.5,102.5 46.5,96 44.053,92.938 35.328,92.882 32.082,96 26.5,96
V3V3D on Int2 (PWR) "Int2 (PWR)-V3V3D" (solid, remove dead copper, pour order 7): 0.5,109.5 0.5,0.5 159.5,0.5 159.5,109.5 37.7,109.5
GNDU on Int2 (PWR) "GNDU_L03_P002" (solid, pour order 2): 26.5,109.5 48,109.5 48,104 46.5,102.5 46.5,96 26.5,96
GND on Bottom Layer "Bottom Layer-GND" (solid, remove dead copper, pour order 4): 0.5,109.5 0.5,0.5 159.5,0.5 159.5,109.5 157.7,109.5
GNDU on Bottom Layer "GNDU_L04_P003" (solid, pour order 3): 26.5,109.5 46.5,109.5 46.5,96 26.5,96
GND on Int1 (GND) "Int1 (GND)-GND" (solid, remove dead copper, pour order 1): 0.5,109.5 0.5,0.5 159.5,0.5 159.5,109.5

## Other copper
Top Layer:
  text "A4403" at 159.346,93.054 h2 r90
  text "www.sistemi.ca" at 159.246,66.854 h1.52 r90
Int1 (GND):
  pour cut-out: 110,7 111.2,7 111.2,0.9 110,0.9
  pour cut-out: 101.3,7 102.6,7 102.6,0.9 101.3,0.9
Int2 (PWR):
  pour cut-out: 110,7 111.1,7 111.1,0.9 110,0.9
  pour cut-out: 101.4,7 102.5,7 102.5,0.8 101.4,0.8

## Silkscreen, mask and mechanical layers (free items; w line width, h text height)
Top Overlay:
  lines w0.1: 41.2,3.1 41.2,3.9 ; 46,2.9 46,3.7 ; 50.6,2.6 50.6,3.4 ; 55.5,2.8 55.5,3.6 ; 40.7,3.1 40.7,3.9 41.1,3.5 40.7,3.1 ; 45.6,2.9 45.6,3.7 46,3.3 45.6,2.9 ; 50.2,2.6 50.6,3 50.2,3.4 50.2,2.6 ; 55.1,2.8 55.1,3.6 55.5,3.2 55.1,2.8
  lines w0.254: 0.9,68.8 36.3,68.8 ; 0.9,69.05 0.9,102.3 36.3,102.3 36.3,69.05
  text "USB-PD 100W" at 15,108.628 h2
  text "20V" at 24.2,107.619 h1.5
  text "I2C1" at 20.7,105.928 h2
  text "3V3" at 17.774,104.3 h2 r90
  text "15V" at 41.1,103.419 h1.5
  text "GND" at 14.972,102.8 h2 r90
  text "SDA" at 22.772,102.7 h2 r90
  text "SCLK" at 20.172,102.6 h2 r90
  text "GND" at 83.672,102 h2 r90
  text "15V" at 49.1,97.219 h1.5
  text "VIN" at 81.4,95.8 h1.5
  text "20V" at 81.5,94.919 h1.5
  text "BOND" at 156.244,93.4 h4 r90
  text "VSYS" at 48.979,88.6 h1.5 r90
  text "FID" at 88.4,84.2 h1.4 r90
  text "V12VA" at 80.1,82.6 h1.6 r90
  text "HDR1 - J5" at 86,79.6 h2
  text "GND" at 135.172,79.6 h2 r90
  text "HDR5 - J4" at 137.8,79.6 h2
  text "VDUT" at 96.403,77.6 h2
  text "VBAT" at 93.663,72.539 h2
  text "V5VA" at 50.974,70 h2 r90
  text "V3V3A" at 58.779,69.5 h1.6 r90
  text "V3V3D" at 43.779,69 h1.6 r90
  text "VDUT" at 118.503,67.8 h2
  text "DISPLAY" at 0.8,67.328 h2
  text "GND" at 118.5,65.628 h2
  text "GND" at 118.6,62.728 h2
  text "EXPANSION" at 136.9,60.5 h2
  text "GND" at 136.372,59 h2 r90
  text "VBAT" at 126.5,57.5 h2 r90
  text "FID" at 114.1,56.3 h1.4
  text "DEBUG" at 4,53.322 h1.6
  text "HDR2 - J9" at 47.7,52.3 h2 r90
  text "GND" at 0.2,51.128 h2
  text "HDR4 - J16" at 155.102,51 h2 r90
  text "ADC" at 0.5,49.622 h1.6
  text "INT" at 0.5,48.6 h1.6
  text "CS" at 1,47.128 h2
  text "H42" at 0.3,46 h2
  text "GND" at 44.9,44.828 h2
  text "GND" at 153.7,44.728 h2
  text "V5V" at 40.174,44.1 h2 r90
  text "VSYS" at 36.272,43.9 h2 r90
  text "H4" at 0.3,43.6 h2
  text "H3" at 0.3,41.026 h2
  text "URARTX" at 8.9,40.828 h2
  text "H2" at 0.2,38.6 h2
  text "UARTRX" at 8.8,38.228 h2
  text "VNEG2V5" at 84.3,37.628 h2
  text "GND" at 153.5,37.328 h2
  text "GND" at 144.8,37.028 h2
  text "H1" at 0.2,36 h2
  text "I2C2CLK" at 8.9,35.628 h2
  text "MISO" at 0,33.55 h1.6
  text "I2C2SDA" at 8.9,33.228 h2
  text "VBAT" at 46.863,32.339 h2
  text "MOSI" at 0,30.929 h1.6
  text "I2C1SDA" at 8.8,30.528 h2
  text "VDUT" at 52.9,28.803 h2 r90
  text "SCLK" at 0,28.394 h1.6
  text "I2C1CLK" at 8.9,28.028 h2
  text "FID" at 53.7,27.7 h1.4
  text "GND" at 133.772,27.7 h2 r90
  text "2.5V" at 91.8,27 h2
  text "GND" at 101.454,26.854 h1.52
  text "GND" at 118.6,25.528 h2
  text "ADC VREF" at 95,24.9 h2
  text "GND" at 118.8,22.628 h2
  text "EXPANSION" at 136.8,20.5 h2
  text "GND" at 92.872,19.6 h2 r90
  text "USER" at 9.872,18.7 h2 r90
  text "TMP" at 11.8,14.9 h2 r90
  text "HDR3 - J11" at 88.6,12.6 h2
  text "SCLK" at 52.872,10 h2 r90
  text "SDA" at 54.472,10 h2 r90
  text "JIG DETECT" at 0,7.496 h1.5
  text "V3V3D" at 11.374,5.9 h2 r90
  text "STLINK-V3MODS" at 134.072,5.5 h2 r90
  text "1" at 39.8,3.3 h2 r90
  text "HMI" at 61.2,0.6 h2
  text "GND" at 60.872,0.5 h2 r90
  text "USB DUT" at 101.078,0.4 h1.6 r90
  text "JIG DETECT" at 9.279,0.3 h1.5 r90
  text "SEGGER JTAG" at 99.578,0.3 h1.6 r90
  text "PASS" at 38.8,0.228 h2
  text "BUSY" at 43.7,0.228 h2
  text "OPER" at 53.4,0.228 h2
  text "FAIL" at 48.6,0.2 h2
Outline:
  the board outline again, w0.254